# Altium PCB Copy of IoT_SYNTHPATCH.PcbDoc (part 2 of 2)
Units mm, origin at the board's own origin, x right, y up, seen from the top; angles counter-clockwise.
Board outline 99 x 108 mm, 4 copper layers (Top Layer, PWR, GND, Bottom Layer), stack 1.587 mm thick; 354 components, 216 nets, 1040 pads, 0 vias.
Unrouted connection lines stored in the file: 706.
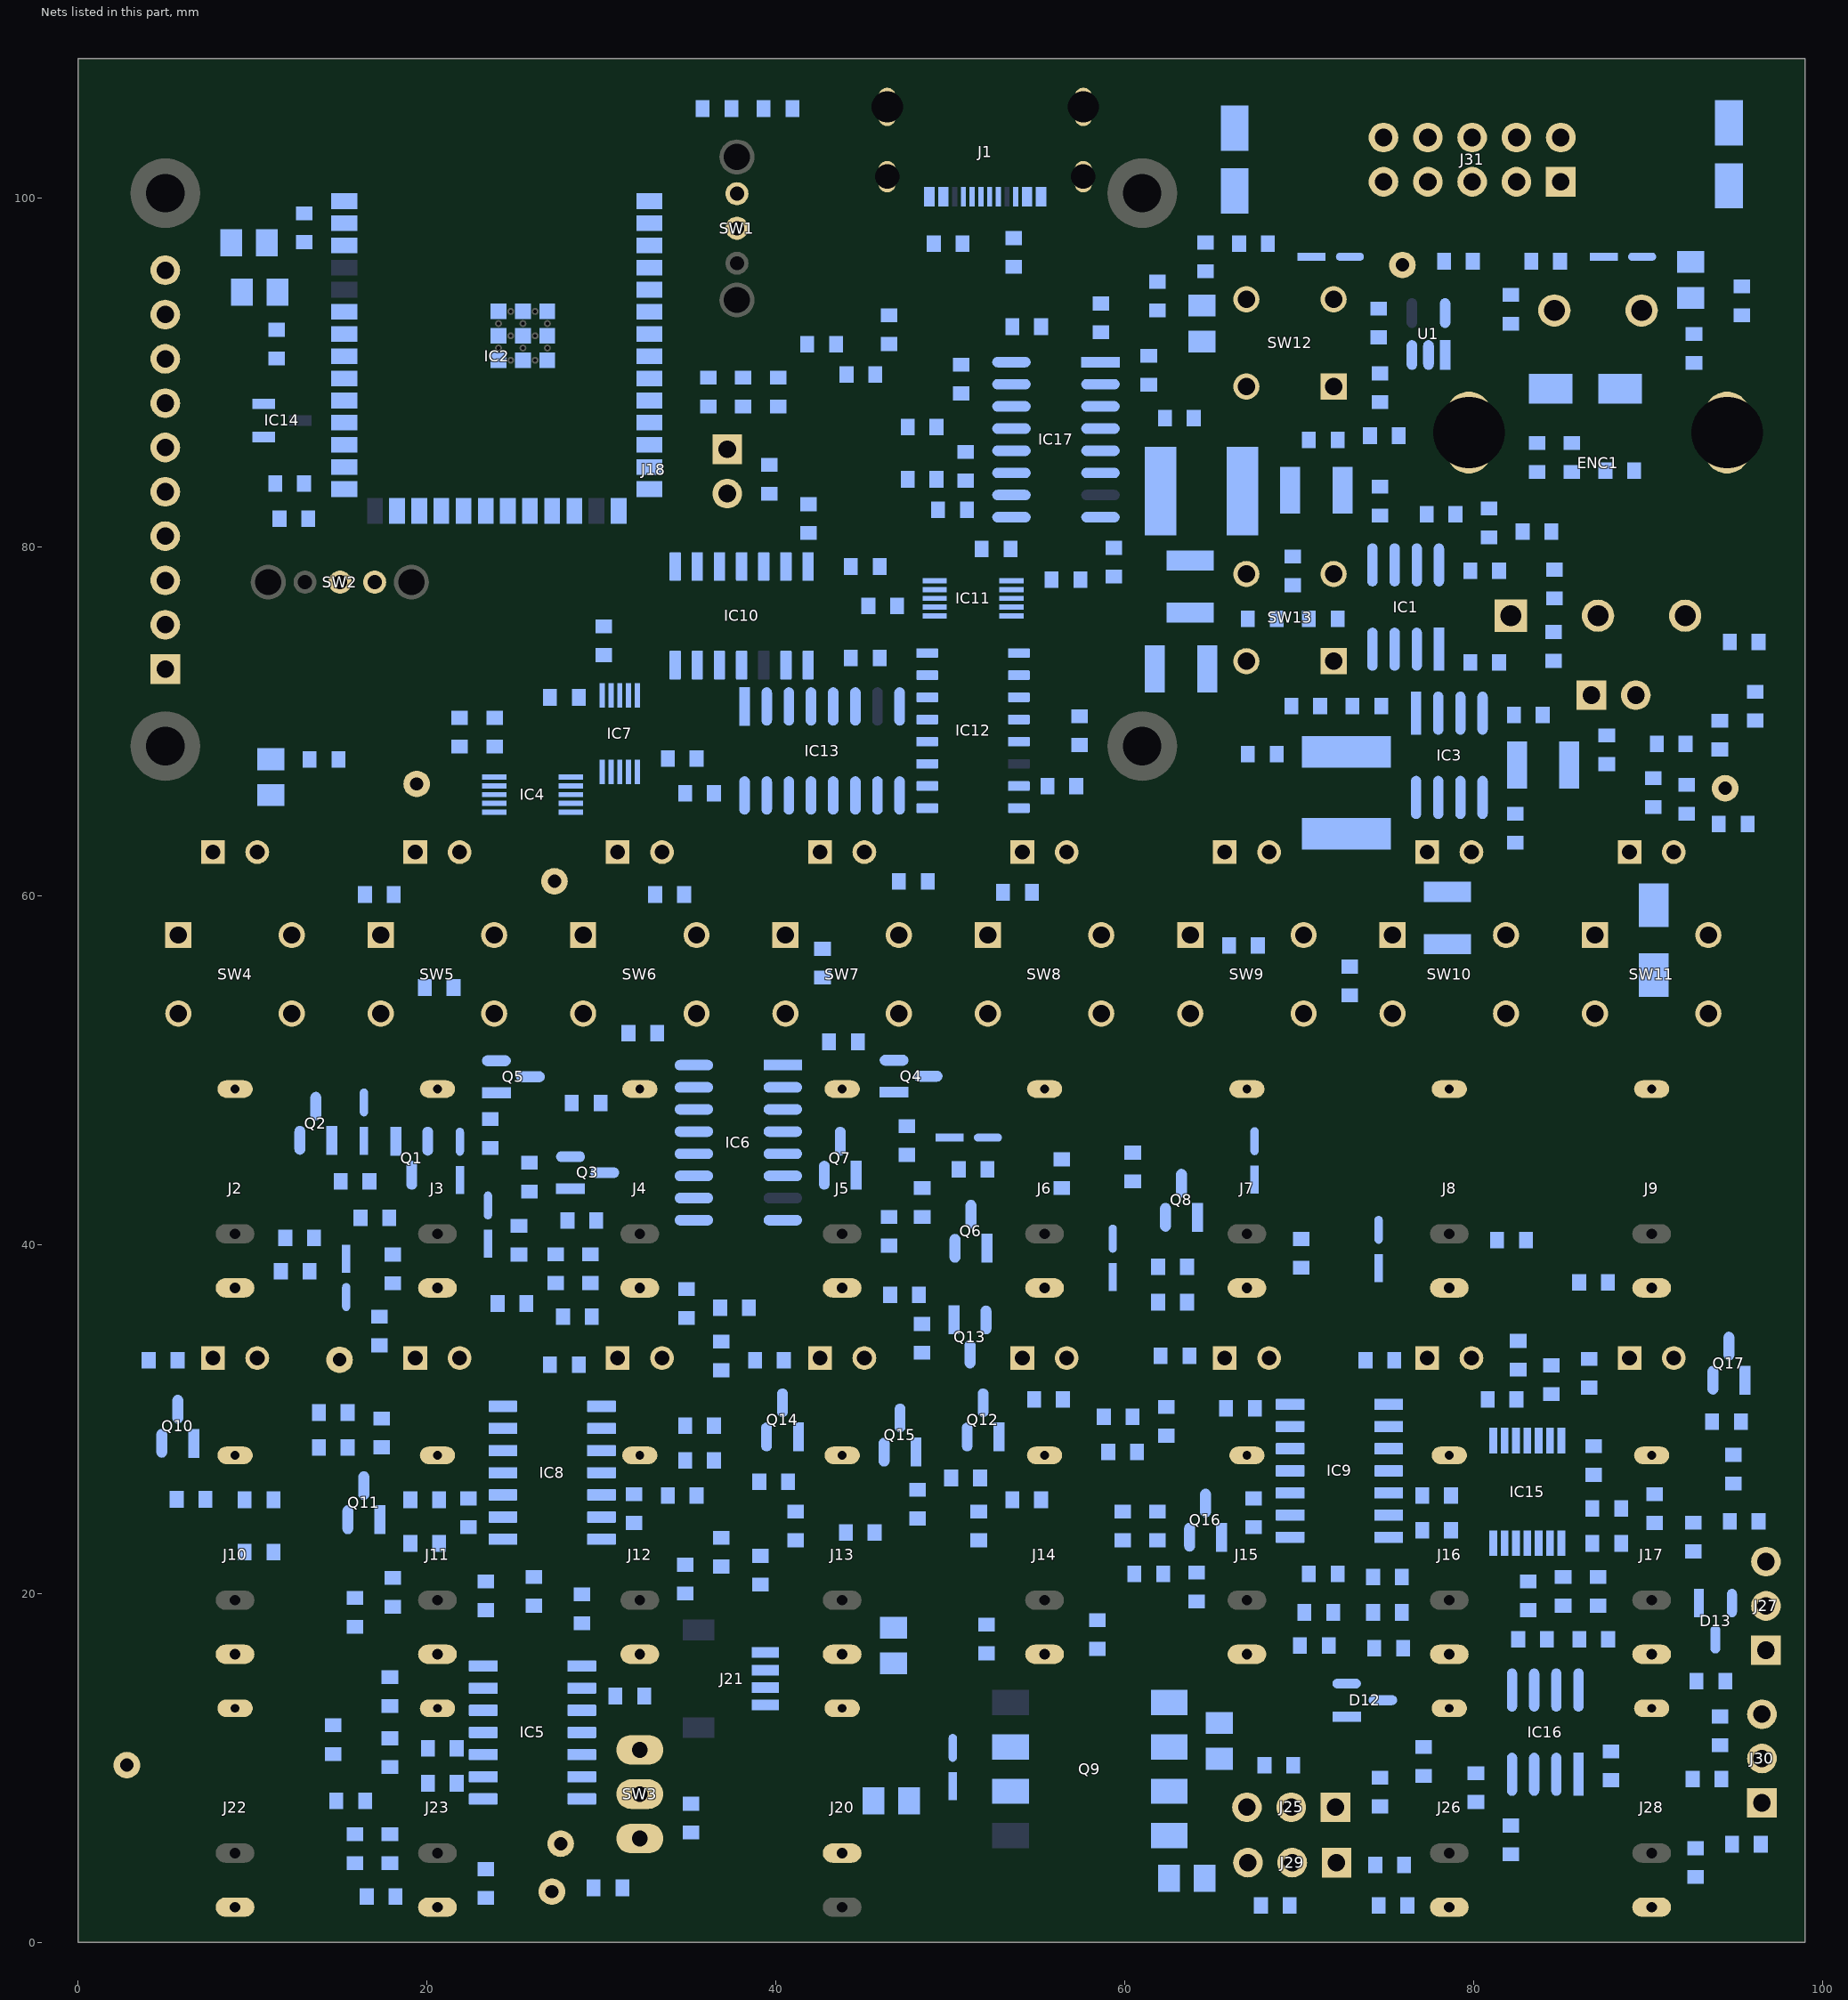
[diagram p4: the nets of this part, all layers, seen from the top]

## Part data
C1 C2 C3 C4 C5 C6 C7 C8 C9 C10 C11 C12 C13 C14 C15 C16 C17 C18 C19 C20 C21 C22 C23 C24 C25 C26 C27 C28 C29 C30 C31 C32 C33 C34 C35 C36 C37 C38 C39 C41 C42 C43 C44 C45 C46 C47 C48 C49 C50 C51 C52 C53 C54 C55 C56 C57 C58 C59 C60 C61 C62 C63 C64 C65 C66 C67 C68 C69 C70 C71 C72 C73 C74 C75 C76 C77 C78 C79 C80 C81 C82 C84 C86 C87 C88 C89: library part CAP, Manufacturer=Vitramon, Part Number=VJ0805Y682KXAMT
C40: library part CAP-np, Manufacturer=Vitramon, Part Number=VJ0805Y682KXAMT
C83 C85: library part Cap_polarized, "WCAP-ASLI Aluminum Electrolytic Capacitors", Capacitance=10µF, Case/Package=Radial, ESR (Equivalent Series Resistance)=1.66693Ω, Insulation Resistance=5.33333MΩ, Leakage Current=3µA, Max Operating Temperature=105°C, Min Operating Temperature=-55°C, Ripple Current=80mA, Tolerance=20%, Voltage Rating=16V, Diameter=4mm, Height=5.5mm, Height - Seated (Max)=5.5118mm, Impedance=2.2Ω, Lead Free="Lead Free", Length=5.5mm, Life (Hours)=2000hours, Mount="Surface Mount", Polarity=Polar, REACH SVHC=Unknown, Ripple Current (AC)=80mA, RoHS=Compliant, Voltage Rating (DC)=16V, Width=4.3mm
D1 D2: library part SCHOTTKY, "DIODE SCHOTTKY 40V 3A SMA", Average Rectified Current=3A, Capacitance=250pF, Case/Package=SMA, Forward Voltage=500mV, Max Forward Surge Current (Ifsm)=80A, Max Operating Temperature=125°C, Max Repetitive Reverse Voltage (Vrrm)=40V, Max Reverse Current=500uA, Min Operating Temperature=-55°C, Package Quantity=5000, Contact Plating=Tin, Current=3A, Current Rating=3A, Element Configuration=Single, Forward Current=3A, Height=2.3mm, Lead Free="Lead Free", Length=4.6mm, Max Reverse Voltage (DC)=40V, Mount="Surface Mount", Number of Pins=2, Output Current=3A, Packaging="Tape and Reel", Peak Non-Repetitive Surge Current=80A, Polarity=Standard, Radiation Hardening=No, REACH SVHC="No SVHC", RoHS Compliant=Yes, Series=-, Termination=SMD/SMT, Voltage=40V, Voltage Rating (DC)=40V, Weight=0.002258oz, Width=2.92mm
D3 D4 D5 D6 D7 D8 D9 D10 D11 D14 D15: library part 4148WS, "DIODE GEN PURP 75V 150MA SOD323F", Average Rectified Current=150mA, Forward Voltage=1V, Max Forward Surge Current (Ifsm)=2A, Max Operating Temperature=150°C, Max Repetitive Reverse Voltage (Vrrm)=75V, Min Operating Temperature=-55°C, Package Quantity=1, Peak Reverse Current=5uA, Power Dissipation=200mW, Contact Plating=Tin, Element Configuration=Single, Forward Current=150mA, Height=1mm, Lead Free="Lead Free", Length=1.8mm, Max Reverse Voltage (DC)=75V, Mount="Surface Mount", Number of Pins=2, Packaging="Tape and Reel", Radiation Hardening=No, REACH SVHC="No SVHC", Recovery Time=4ns, Reverse Recovery Time=4ns, Reverse Voltage=75V, Weight=0.0276g, Width=1.35mm
D12 D13: library part BAT54S, "DIODE ARRAY SCHOTTKY 30V SOT23", Capacitance=10pF, Forward Current=200mA, Manufacturer=Vishay, Max Junction Temp=+125°C, Max Repetitive Reverse Voltage=30V, Max Surge Forward Current=600mA, Package=6.541-5014.01-4, Peak Reverse Current=2uA, Temperature="-55°C to +125°C", Temperature Range Low=-55°C, Automotive=No, Category=Diode, ComponentLink2Description=Datasheet, ComponentLink2URL=http://www.vishay.com/docs/85508/bat54.pdf, Device Class L1="Discrete Semiconductors", Device Class L2=Diodes, Device Class L3="Schottky Diodes", Digikey Description="DIODE ARRAY SCHOTTKY 30V SOT23", Height=1.15mm, Lead Free=Yes, Manufacturer Part Number=BAT54S-E3-08, Mouser Description="Schottky Diodes & Rectifiers 200mA 30 Volt", Octopart=https://octopart.com/bat54s-e3-08-vishay-29186616, RoHS=TRUE, Temperature Range High=+125°C
DS1 DS2 DS3: library part CMP-1674-00012-1, "Through Hole Lamp, 2.1 V, -55 to 100 degC, 2-Pin THD, RoHS, Bulk", Case Code (Imperial)=0603, Case Code (Metric)=1608, Colour=White, Forward Current="20 mA", Forward Voltage="3.6 V", Max Operating Temperature="85 degC", Min Operating Temperature="-40 degC", Package Quantity=4000, Power Rating="78 mW", Case\Package=0603, ComponentLink1Description="Manufacturer URL", ComponentLink1URL=http://www.us.liteon.com/, ComponentLink2Description=Datasheet, ComponentLink2URL=https://datasheet.ciiva.com/4269/s-110-ltl-1chye-4269126.pdf, DatasheetVersion="Rev. B, 07/2013", Height="0.6 mm", Illumination Colour=White, Length="1.6 mm", Lens Style=Diffused, Luminous Intensity="200 mcd", Mount="Surface Mount", Nominal Vf="3.6 V", PackageDescription="2-Pin Through Hole Device, Dia 3.8 mm, Pitch 2.54 mm", PackageReference=LTL-1CHYE, Packaging="Tape and Reel", Pins=2, Radiation Hardening=No, REACH SVHC="No SVHC", RoHSCompliant=true, Viewing Angle="140 degrees", Width="0.8 mm"
DS4 DS5 DS6 DS7 DS8 DS9 DS10 DS11 DS12 DS13 DS14 DS15 DS16 DS17 DS18 DS19: library part LED-Y, "Through Hole Lamp, 2.1 V, -55 to 100 degC, 2-Pin THD, RoHS, Bulk", Case Code (Imperial)=0603, Case Code (Metric)=1608, Colour=White, Forward Current="20 mA", Forward Voltage="3.6 V", Max Operating Temperature="85 degC", Min Operating Temperature="-40 degC", Package Quantity=4000, Power Rating="78 mW", Case\Package=0603, ComponentLink1Description="Manufacturer URL", ComponentLink1URL=http://www.us.liteon.com/, ComponentLink2Description=Datasheet, ComponentLink2URL=https://datasheet.ciiva.com/4269/s-110-ltl-1chye-4269126.pdf, DatasheetVersion="Rev. B, 07/2013", Height="0.6 mm", Illumination Colour=White, Length="1.6 mm", Lens Style=Diffused, Luminous Intensity="200 mcd", Mount="Surface Mount", Nominal Vf="3.6 V", PackageDescription="2-Pin Through Hole Device, Dia 3.8 mm, Pitch 2.54 mm", PackageReference=LTL-1CHYE, Packaging="Tape and Reel", Pins=2, Radiation Hardening=No, REACH SVHC="No SVHC", RoHSCompliant=true, Viewing Angle="140 degrees", Width="0.8 mm"
ENC1: library part ROTARY, "ROTARY ENCODER MECHANICAL 12PPR", Max Operating Temperature=70°C, Min Operating Temperature=-30°C, Operating Supply Voltage=5V, Package Quantity=50, Built in Switch=Yes, Detent=Yes, Encoder Type=Mechanical, Height=17.3mm, Length=23mm, Mount="Through Hole", Number of Channels=2, Orientation=Vertical, Output Type=Quadrature, Pulses per Revolution=12, RoHS Compliant=Yes, Series=PEC16, Termination="PC Pin", Width=16mm
FB1 FB2: library part Ferrite, "Chip Ferrite Bead, 0805, 60Ω @ 100MHz, 0.02Ω, 25%, 1.9A", RoHS Compliant=No
IC1 IC3: library part TPSS54331, "Buck Step Down Regulator with 3.5 to 28 V Input and 0.8 to 25 V Output, -40 to 150 degC, 8-Pin SOIC (D), Green (RoHS & no Sb/Br)", Manufacturer="Texas Instruments", Rating=Catalog, Switch Current Limit(Typ)(A)=3.5, Code_JEDEC=MS-012AA, ComponentLink1Description=Datasheet, ComponentLink1URL=http://www.ti.com/general/docs/lit/getliterature.tsp?genericPartNumber=TPS54331&fileType=pdf, ComponentLink2Description="Package Specification", ComponentLink2URL=http://www.ti.com/litv/pdf/msoi002j, ComponentLink3Description="URL Link1", ComponentLink3URL="Samples URL:http://www.ti.com/product/tps54331#samples", DatasheetVersion=SLVS839D, Duty Cycle(Max)(%)=90, Eco-Plan="Green (RoHS & no Sb/Br)", Iout(Max)(A)=3, Iq(Typ)(mA)=0.11, Mounting Technology="Surface Mount", PackageDescription="8-Pin Plastic Small Outline Integrated Circuit, 4.9 x 3.9 mm, Pitch 1.27 mm Pitch", PackageReference=D8, PackageVersion="revM, Jun-2011", PartNumber=TPS54331DG4, Regulated Outputs(#)=1, SubFamily="Step-Down Regulator", Topology=Buck, Vin(Max)(V)=28, Vin(Min)(V)=3.5, Vout(Max)(V)=25, Vout(Min)(V)=0.8
IC2: "Bluetooth, WiFi 802.11b/g/n, Bluetooth v5.0 Transceiver Module 2.4GHz PCB Trace Surface Mount", Package="NON STANDARD Espressif Systems", Check_prices=https://www.snapeda.com/parts/ESP32S3WROOM1N16R2/Espressif+Systems/view-part/?ref=eda, MF="Espressif Systems", MP=ESP32S3WROOM1N16R2, SnapEDA_Link=https://www.snapeda.com/parts/ESP32S3WROOM1N16R2/Espressif+Systems/view-part/?ref=snap
IC4: "16-bit, dual-channel, low-power, ultra-low glitch, voltage output DAC with 2.5V, 4ppm/C reference", Manufacturer_Name="Texas Instruments", Mouser Part Number=595-DAC8562SDGSR, Datasheet Link=http://www.ti.com/lit/gpn/dac8562, Geometry.Height=1.1mm, Manufacturer_Part_Number=DAC8562SDGSR, Mouser Price/Stock=https://www.mouser.co.uk/ProductDetail/Texas-Instruments/DAC8562SDGSR?qs=L4ss%2FyqpMWQjhHzbOFnTNg%3D%3D
IC5 IC8 IC9: library part tl074, "Quad Low-Noise JFET-Input General-Purpose Operational Amplifier, 7 to 36 V, 0 to 70 degC, 14-pin SOIC (D14), Green (RoHS & no Sb/Br)", Manufacturer="Texas Instruments", Rating=Military, Total Supply Voltage(Max)(+5V is 5, +/-5V is 10)=36, Total Supply Voltage(Min)(+5V is 5, +/-5V is 10)=7, CMRR(Min)(dB)=70, Code_JEDEC=MS-012, ComponentLink1Description="Manufacturer URL", ComponentLink1URL=http://www.ti.com/, ComponentLink2Description=Datasheet, ComponentLink2URL=http://www.ti.com/lit/ds/symlink/tl074.pdf, ComponentLink3Description="Package Specification", ComponentLink3URL=http://www.ti.com/lit/ml/mpds177g/mpds177g.pdf, DatasheetVersion=SLOS080J, Eco-Plan="Green (RoHS & no Sb/Br)", GBW(Typ)(MHz)=3, IIB(Max)(pA)=200, Iq per channel(Max)(mA)=2.5, Mounting Technology="Surface Mount", Number of Channels=4, Offset Drift(Typ)(uV/C)=18, PackageDescription="14-Pin Plastic Small Outline, Body 8.65 x 3.90 mm, Pitch 1.27 mm", PackageReference=D0014A, PackageVersion="4040047-5/M, 06/2011", PartNumber=TL074CDRG4, Slew Rate(Typ)(V/us)=13, Sub Family="General Purpose Amplifier, High Supply Voltage Amplifier (>=30V)", Vio (25C)(Max)(mV)=10, Vn at 1kHz(Typ)(nV/rtHz)=18
IC6 IC13 IC17: library part 74HC165, "IC SHIFT REGST 8BIT PI-SO 16SOIC", Ambient Temperature Range High=+125°C, Ambient Temperature Range Low=-40°C, Frequency=61MHz, Manufacturer=Nexperia, Max Supply Voltage=6V, Min Supply Voltage=2V, Nominal Supply Current=8uA, Package=SOT109-1, Temperature="-40°C to +125°C", Automotive=No, Category=IC, ComponentLink2Description=Datasheet, ComponentLink2URL=https://assets.nexperia.com/documents/data-sheet/74HC_HCT165.pdf, Device Class L1="Integrated Circuits (ICs)", Device Class L2="Logic ICs", Device Class L3="Shift Registers", Digikey Description="IC SHIFT REGST 8BIT PI-SO 16SOIC", Footprint Url=https://assets.nexperia.com/documents/outline-drawing/SOT109-1.pdf, Height=1.75mm, Ipc Land Pattern Name=SOP127P600X175-16, Lead Free=Yes, Logic Function Desc="Shift Register", Manufacturer Part Number=74HC165D,653, Number Of Circuits=1, Number Of Inputs=8, Number Of Outputs=1, Octopart=https://octopart.com/74hc165d%2C653-nexperia-78737091, Propagation Delay=15ns, RoHS=TRUE, Standoff Height=0.1mm, Temperature Range High=+125°C, Temperature Range Low=-40°C
IC7 IC11: "12-Bit Micro Power QUAD Digital-to-Analog Converter with Rail-to-Rail Output", Manufacturer_Name="Texas Instruments", Manufacturer_Part_Number=DAC124S085CIMM/NOPB, Mouser Part Number=926-DAC124S085CIMMNO, Datasheet Link=http://www.ti.com/lit/gpn/dac124s085, Geometry.Height=1.1mm, Mouser Price/Stock=https://www.mouser.co.uk/ProductDetail/Texas-Instruments/DAC124S085CIMM-NOPB?qs=7X5t%252BdzoRHBv34DgWfHrUA%3D%3D
IC10: library part 74HCT125, "IC BUF NON-INVERT 5.5V 14SOIC", Case/Package=SOIC, High Level Output Current=-6mA, Low Level Output Current=6mA, Max Operating Temperature=85°C, Max Supply Voltage=5.5V, Min Operating Temperature=-40°C, Min Supply Voltage=4.5V, Operating Supply Voltage=5V, Package Quantity=2500, Quiescent Current=8uA, Contact Plating=Gold, Height=1.58mm, Lead Free="Lead Free", Length=8.65mm, Logic Function=Buffer, Mount="Surface Mount", Number of Bits=4, Number of Bits per Element=1, Number of Channels=4, Number Of Circuits=4, Number of Elements=4, Number of Input Lines=4, Number Of Inputs=4, Number of Output Lines=4, Number Of Outputs=4, Number of Pins=14, Packaging="Tape and Reel", Polarity=Non-Inverting, Propagation Delay=50ns, Radiation Hardening=No, REACH SVHC="No SVHC", RoHS Compliant=Yes, Turn-On Delay Time=36ns, Width=3.91mm
IC12: library part TLC5916, "Automotive Catalog 8-Bit Constant-Current LED Sink Drivers, 3 to 5.5 V, -40 to 125 degC, 16-pin SOIC (D16), Green (RoHS & no Sb/Br)", Manufacturer="Texas Instruments", Code_JEDEC=MS-012, ComponentLink1Description="Manufacturer URL", ComponentLink1URL=http://www.ti.com/, ComponentLink2Description=Datasheet, ComponentLink2URL=http://www.ti.com/general/docs/lit/getliterature.tsp?genericPartNumber=TLC5916-Q1&fileType=pdf, ComponentLink3Description="Package Specification", ComponentLink3URL=http://www.ti.com/litv/pdf/mpds178g, DatasheetVersion=SLVS814, Eco-Plan="Green (RoHS & no Sb/Br)", Iout(Max)(A)=0.12, Mounting Technology="Surface Mount", PackageDescription="16-Pin Plastic Small Outline, Body 9.90 x 3.90 mm, Pitch 1.27 mm", PackageReference=D0016A, PackageVersion=4040047-6/M, PartNumber=TLC5916QDRQ1, SubFamily="LED Driver", Vin(Max)(V)=5.5, Vin(Min)(V)=3
IC14: library part lm4040, "Precision Micropower Shunt Voltage Reference, 3-pin SOT-23, Pb-Free", Manufacturer="National Semiconductor", PackageTopMarking=R5C*XTT, PowerWise=N, ComponentLink1Description="LM4040 Datasheet", ComponentLink1URL=http://www.national.com/ds/LM/LM4040.pdf, ComponentLink2Description="LM4040 Web Page", ComponentLink2URL=http://www.national.com/pf/LM/LM4040.html, ComponentLink3Description="MF03A Package Page", ComponentLink3URL=http://www.national.com/packaging/folders/mf03a.html, CompType="Voltage Reference IC", DatasheetVersion=Apr-2005, PackageDescription="Molded SOT-23, .115 x .051 x .037in Body, 3 Lead, .075 in Pitch", PackageReference=MF03A, PackageVersion="revB, Mar-2003", PinCount=3, RevisionNote="Component URLs added", RoHS=Y
IC15: "99dB SNR Stereo ADC With Single-Ended Inputs", Manufacturer_Name="Texas Instruments", Mouser Part Number=595-PCM1808PW, Datasheet Link=http://www.ti.com/lit/gpn/pcm1808, Geometry.Height=1.2mm, Manufacturer_Part_Number=PCM1808PW, Mouser Price/Stock=https://www.mouser.co.uk/ProductDetail/Texas-Instruments/PCM1808PW?qs=iSMark9AYDWYQaMpH%2FhwPg%3D%3D
IC16: library part tl072, "Low-Noise JFET-Input Operational Amplifier, 7 to 36 V, 0 to 70 degC, 8-pin SOIC (D8), Green (RoHS & no Sb/Br)", Manufacturer="Texas Instruments", Rating=Catalog, Total Supply Voltage(Max)(+5V is 5, +/-5V is 10)=36, Total Supply Voltage(Min)(+5V is 5, +/-5V is 10)=7, CMRR(Min)(dB)=75, Code_JEDEC=MS-012, ComponentLink1Description="Manufacturer URL", ComponentLink1URL=http://www.ti.com/, ComponentLink2Description=Datasheet, ComponentLink2URL=http://www.ti.com/lit/ds/symlink/tl072a.pdf, ComponentLink3Description="Package Specification", ComponentLink3URL=http://www.ti.com/litv/pdf/msoi002j, DatasheetVersion=SLOS080J, Eco-Plan="Green (RoHS & no Sb/Br)", GBW(Typ)(MHz)=3, IIB(Max)(pA)=200, Iq per channel(Max)(mA)=2.5, Mounting Technology="Surface Mount", Number of Channels=2, Offset Drift(Typ)(uV/C)=18, PackageDescription="8-Pin Plastic Small Outline, Body 4.9 x 3.9 mm, Pitch 1.27 mm", PackageReference=D8, PackageVersion="4040047-3/M, 06/2011", PartNumber=TL072ACDRE4, Slew Rate(Typ)(V/us)=13, Sub Family="General Purpose Amplifier, High Supply Voltage Amplifier (>=30V)", Vio (25C)(Max)(mV)=6, Vn at 1kHz(Typ)(nV/rtHz)=18
J1: library part USBC16, "CONN RCP USB2.0 TYP C 24P SMD RA"
J2 J3 J4 J5 J6 J7 J8 J9 J10 J11 J12 J13 J14 J15 J16 J17 J22 J23 J26 J28: "3.5mm Switching Jack Socket", Package=Package, Availability="Not in stock", MF=Thonk, MP=PJ398SM-12, Price=None
J18: library part DFR0664
J20: library part MIDI_connector, "3.5mm TRS jack (stereo Thonkiconn PJ366ST), MIDI TRS Type A: tip=5, ring=4, sleeve=2", Case/Package=Metal, Color=Black, Current Rating=3A, Package Quantity=1, Voltage Rating=34V, Body Material=Metal, Connector Type=Receptacle, Contact Plating=Nickel, Contact Type=Pin, Fastening Type=Pull, Gender=Female, Insulation Material=Plastic, Lead Free="Lead Free", Mount="Through Hole", Number of Contacts=5, Number of Ports=1, Number of Positions=5, Number of Terminals/Pins=5, Orientation="Right Angle", Packaging=Bulk, Radiation Hardening=No, RoHS Compliant=Yes, Series=-, Strain Relief="No (Without)", Termination=Solder
J21: "Description", Manufacturer_Name="Adafruit Industries", Copyright="Copyright (C) 2025 Ultra Librarian. All rights reserved.", Manufacturer_Part_Number=4208, RefDes=RefDes, Type=Type
J31: library part EURORACK_PWR_2x5, "Eurorack power header 2x5 shrouded. Pin 1-2 -12V (red stripe), 3-8 GND, 9-10 +12V"
L1 L2: library part Inductor, "6.8uH shielded power inductor 6x6 mm, Isat >= 2 A (e.g. Bourns SRN6045TA-6R8M)", Ambient Temperature Range High=85°C, Case/Package=0805, DC Resistance (DCR)=50mΩ, Inductance=110nH, Max DC Current=2A, Min Operating Temperature=-40°C, Self Resonant Frequency=1.2GHz, Test Frequency=7.9MHz, Tolerance=2%, Composition=Wirewound, Core Material="Ceramic, Ferrite", Height=1.6mm, Lead Free="Contains Lead", Length=2.29mm, Lifecycle Status=Production, Max Operating Temperature=85°C, NexarPartId=6751235, Q Factor=19, RMS Current (Irms)=2A, RoHS=Compliant, Series Resistance=50mΩ, Termination=SMD/SMT, Weight=5.499807mg, Width=1.91mm
Q1 Q2 Q3 Q4 Q5 Q6 Q7 Q8 Q10 Q11 Q12 Q13 Q14 Q15 Q16 Q17: library part 3904, "TRANS NPN 40V 0.2A SMD SOT23-3", Case/Package=SOT-23, Collector Base Voltage (VCBO)=60V, Collector Emitter Breakdown Voltage=40V, Collector Emitter Saturation Voltage=300mV, Continuous Collector Current=200mA, Emitter Base Voltage (VEBO)=6V, Frequency=300MHz, Max Operating Temperature=150°C, Max Power Dissipation=300mW, Min Operating Temperature=-55°C, Package Quantity=3000, Power Dissipation=350mW, Collector Emitter Voltage (VCEO)=40V, Contact Plating=Tin, Element Configuration=Single, Gain Bandwidth Product=300MHz, Height=1mm, hFE Min=100, Lead Free="Lead Free", Length=3.05mm, Max Breakdown Voltage=40V, Max Collector Current=200mA, Max Frequency=300MHz, Mount="Surface Mount", Number of Elements=1, Number of Pins=3, Packaging="Tape and Reel", Polarity=NPN, Radiation Hardening=No, REACH SVHC="No SVHC", Transition Frequency=300MHz, Voltage Rating (DC)=40V, Weight=0.000282oz, Width=1.4mm
Q9: "OPTOISO 3.75KV OPN COLL 8DIP GW", Ambient Temperature Range High=+85°C, Ambient Temperature Range Low=-40°C, Forward Current=10mA, Forward Voltage=1.5V, Isolation Voltage=3750Vrms, Manufacturer=Broadcom, Manufacturer Part Number=6N137-300E, Max Supply Voltage=5.5V, Min Supply Voltage=4.5V, Package=0, Reverse Voltage=5V, Temperature="-40°C to +85°C", Automotive=No, Category=Trans, ComponentLink2Description=Datasheet, ComponentLink2URL=https://docs.broadcom.com/docs/AV02-0940EN, Device Class L1=Optoelectronics, Device Class L2=Optocouplers, Device Class L3=unset, Digikey Description="OPTOISO 3.75KV OPN COLL 8DIP GW", Height=4.455mm, Lead Free=Yes, Mouser Description="High Speed Optocouplers 10 Mb/s 3750Vrms", Octopart=https://octopart.com/6n137-300e-broadcom-71125550, RoHS=TRUE, Standoff Height=0.505mm, Temperature Range High=+85°C, Temperature Range Low=-40°C, Turn Off Delay Time=50ns, Turn On Delay Time=48ns
R1 R2 R3 R4 R5 R6 R7 R8 R9 R10 R11 R12 R13 R14 R15 R16 R17 R18 R19 R20 R21 R22 R23 R24 R25 R26 R27 R28 R29 R30 R31 R32 R33 R34 R35 R36 R37 R38 R39 R40 R41 R42 R43 R44 R45 R46 R47 R48 R49 R50 R51 R52 R53 R54 R55 R56 R57 R58 R59 R60 R61 R62 R63 R64 R65 R66 R67 R68 R69 R70 R71 R72 R73 R74 R75 R76 R77 R78 R79 R80 R81 R82 R83 R84 R85 R86 R87 R88 R89 R90 R91 R92 R93 R94 R95 R96 R97 R98 R99 R100 R101 R102 R103 R104 R105 R106 R107 R108 R109 R110 R111 R112 R113 R114 R115 R116 R117 R118 R119 R120 R121 R122 R123 R124 R125 R126 R127 R128 R129 R130 R131 R132 R133 R134 R135 R136 R137 R138 R139: library part Resistor, "RES 10K OHM 0.1% 1/8W 0805"
SW1 SW2: "Switch Slide ON ON SPDT Side Slide 0.1A 12VDC 10000Cycles PC Pins Bracket Mount/Through Hole Bulk", Package=None, Check_prices=https://www.snapeda.com/parts/OS102011MA1QN1/Littelfuse/view-part/?ref=eda, MF=Littelfuse/C&K, MP=OS102011MA1QN1, SnapEDA_Link=https://www.snapeda.com/parts/OS102011MA1QN1/Littelfuse/view-part/?ref=snap
SW3: library part SPDT, "7101SD9CQE Toggle Switch, Spdt, On-On, Maintained, 5A, 28Vdc, 3 Pcb Hole Cnt, Solder Terminal, Toggle", Contact Current Rating=5A, Contact Resistance=10mΩ, Max Operating Temperature=85°C, Max Voltage Rating (AC)=250V, Max Voltage Rating (DC)=28V, Min Operating Temperature=-30°C, Voltage Rating (AC)=120V, Actuator Length=12.45mm, Actuator Material="Brass, Chrome", Contact Material=Silver, Contact Plating=Silver, Current Rating=5A, Depth=6.86mm, Electrical Life=100kcycles, Housing Material="Stainless Steel", Illumination Type="Illuminated, Non-Illuminated", Lead Free="Lead Free", Length=12.7mm, Life (Cycles)=100kcycles, Max Current Rating=5A, Mount="Through Hole", NexarPartId=55410166, Orientation=Straight, Radiation Hardening=No, RoHS=Compliant, Switch Function=On-On, Termination="PC Pins", Throw Configuration=SPDT, Voltage Rating (DC)=28V
SW4 SW5 SW6 SW7 SW8 SW9 SW10 SW11 SW12 SW13: "FSM4JH=6MM TACT SWITCH, HIGH TEMP", Package=None, Check_prices=https://www.snapeda.com/parts/1825910-6/TE+Connectivity+Alcoswitch+Switches/view-part/?ref=eda, MF="TE Connectivity", MP=1825910-6, SnapEDA_Link=https://www.snapeda.com/parts/1825910-6/TE+Connectivity+Alcoswitch+Switches/view-part/?ref=snap
tp1 tp2 tp3 tp4 tp5 tp6 tp7 tp8: library part Testpoint
U1: library part CMP-12756-000035-1, "IC REG LINEAR 3.3V 600MA SOT25", Case/Package=SOT-23-5, Dropout Voltage=250mV, Max Input Voltage=6V, Max Operating Temperature=85°C, Max Output Current=600mA, Min Input Voltage=2.5V, Min Operating Temperature=-40°C, Output Voltage=3.3V, Package Quantity=1, Quiescent Current=55uA, Accuracy=1.5%, Height=1.3mm, Lead Free="Lead Free", Length=3.1mm, Mount="Surface Mount", Number Of Outputs=1, Number of Pins=5, Number of Regulators=1, Output Current=600mA, Output Type=Fixed, Packaging="Tape and Reel", Polarity=Positive, Width=1.7mm

## Nets (pads, with @x,y where several pads share a name; then routed paths per layer and width w, separated by ;. In a path a pad name is that pad's centre, name@x,y a point inside that pad or via, vN(x,y) a via of type N, cw(c..) or ccw(c..) an arc to the next point about the centre after c; other vN are vias at no path point)
+3.3: C10.2 C11.2 C17.2 C34.1 C40.2 C60.1 C61.2 C73.2 C87.1 IC2.2 IC6.16 IC12.16 IC13.16 IC15.4 IC17.16 J19.2 J21.2 L1.2 Q9.8 R1.2 R4.1 R7.2 R11.1 R32.1 R33.1 R34.1 R35.1 R36.1 R37.1 R38.1 R40.1 R76.2 R81.1 R82.1 R83.1 R84.1 R85.1 R86.1 R87.1 R88.1 R89.2 R117.2 R118.2 R121.2 R132.1 R133.1 R134.1 R135.1 R136.1 R137.1 R138.1 R139.1
+5: C22.2 C23.2 C24.2 C28.2 C29.2 C37.2 C38.2 C41.2 C42.2 C62.2 C63.2 C88.2 C89.2 DS4.1 DS5.1 DS6.1 DS7.1 DS8.1 DS9.1 DS10.1 DS11.1 IC4.9 IC7.1 IC10.14 IC11.1 J18.1 L2.2 R10.1 R16.1 R19.2 R92.1 R93.1 R98.1 R99.1 R104.1 R105.1 R110.1 R111.1 R123.2
+5_USB: C2.2 C3.2 J1.A4-B9 J1.B4-A9 U1.1 U1.3
+12: C19.2 C20.2 C21.2 C30.2 C44.1 C45.1 C48.1 C49.1 C58.2 C74.1 C75.1 D12.2 D13.2 FB2.1 IC3.2 IC5.4 IC8.4 IC9.4 IC16.8 J24.1 R14.2 R116.1
-12: C31.2 C46.1 C47.1 C50.1 C51.1 C59.2 C76.1 C77.1 D12.1 D13.1 FB1.1 IC5.11 IC8.11 IC9.11 IC16.4
ADC_INL: C72.1 D12.3 R127.2
ADC_INR: C69.1 D13.3 R131.2
BOOT: C15.2 IC2.27 R76.1 SW2.2
D0: IC6.11 Q1.3 R32.2
D0_L: IC13.11 R81.2 SW4.3 SW4.4
D0_M: IC17.11 R132.2 SW12.3 SW12.4
D1: IC6.12 Q3.3 R33.2
D1_L: IC13.12 R82.2 SW5.3 SW5.4
D1_M: IC17.12 R133.2 SW13.3 SW13.4
D2: IC6.13 Q5.3 R34.2
D2_L: IC13.13 R83.2 SW6.3 SW6.4
D2_M: IC17.13 R134.2
D3: IC6.14 Q7.3 R35.2
D3_L: IC13.14 R84.2 SW7.3 SW7.4
D3_M: IC17.14 R135.2
D4: IC6.3 Q2.3 R36.2
D4_L: IC13.3 R85.2 SW8.3 SW8.4
D4_M: IC17.3 R136.2
D5: IC6.4 Q4.3 R37.2
D5_L: IC13.4 R86.2 SW9.3 SW9.4
D5_M: IC17.4 R137.2
D6: IC6.5 Q6.3 R38.2
D6_L: IC13.5 R87.2 SW10.3 SW10.4
D6_M: IC17.5 R138.2
D7: IC6.6 Q8.3 R40.2
D7_L: IC13.6 R88.2 SW11.3 SW11.4
D7_M: IC17.6 R139.2
D_N: IC2.13 R78.1
D_P: IC2.14 R77.1
ENC_A: ENC1.A R117.1 R119.2
ENC_B: ENC1.B R121.1 R122.2
ENC_SW: ENC1.E R118.1 R120.2
GND: C2.1 C3.1 C4.1 C4.2 C5.1 C5.2 C6.1 C6.2 C7.1 C8.1 C9.1 C10.1 C11.1 C13.1 C14.2 C15.1 C16.1 C17.1 C19.1 C20.1 C21.1 C22.1 C23.1 C24.1 C26.1 C27.1 C27.2 C28.1 C29.1 C30.1 C31.1 C34.2 C37.1 C38.1 C39.1 C40.1 C41.1 C42.1 C43.1 C44.2 C45.2 C46.2 C47.2 C48.2 C49.2 C50.2 C51.2 C58.1 C59.1 C60.2 C61.1 C62.1 C63.1 C64.1 C65.1 C66.1 C67.1 C68.1 C70.1 C71.1 C73.1 C74.2 C75.2 C76.2 C77.2 C82.2 C83.1 C84.1 C85.2 C86.2 C87.2 C88.1 C89.1 D1.2 D2.2 D3.2 D4.2 D5.2 D6.2 D7.2 D8.2 D9.2 D10.2 D14.1 D15.2 DS1.2 DS2.2 DS3.2 ENC1.1 ENC1.2 ENC1.C ENC1.D IC1.7 IC2.GND IC3.4 IC3.7 IC4.3 IC4.4 IC5.12 IC6.8 IC6.15 IC7.6 IC10.1 IC10.2 IC10.4 IC10.7 IC10.10 IC10.13 IC11.6 IC12.1 IC13.8 IC13.15 IC14.2 IC15.2 IC15.5 IC15.10 IC15.11 IC15.12 IC16.3 IC16.5 IC17.8 IC17.10 IC17.15 J1.1 J1.2 J1.3 J1.4 J1.A1-B12 J1.B1-A12 J2.3 J3.3 J4.3 J5.3 J6.3 J7.3 J8.3 J9.3 J10.3 J11.3 J12.3 J13.3 J14.3 J15.3 J16.3 J17.3 J18.2 J19.1 J21.1 J22.3 J23.3 J26.3 J28.3 J31.3 J31.4 J31.5 J31.6 J31.7 J31.8 Q1.2 Q2.2 Q3.2 Q4.2 Q5.2 Q6.2 Q7.2 Q8.2 Q9.5 Q10.2 Q11.2 Q12.2 Q13.2 Q14.2 Q15.2 Q16.2 Q17.2 R5.1 R6.1 R8.1 R9.1 R13.1 R17.1 R18.1 R20.1 R30.1 R31.1 R42.1 R43.1 R46.1 R47.1 R50.1 R51.1 R54.1 R56.1 R66.1 R68.1 R79.1 R80.1 R91.1 R94.2 R95.2 R100.2 R101.2 R106.2 R107.2 R112.2 R113.2 SW1.3 SW2.3 SW3.3 SW4.1 SW4.2 SW5.1 SW5.2 SW6.1 SW6.2 SW7.1 SW7.2 SW8.1 SW8.2 SW9.1 SW9.2 SW10.1 SW10.2 SW11.1 SW11.2 SW12.1 SW12.2 SW13.1 SW13.2 U1.2 U1.5
NetC1_1: C1.1 IC1.1
NetC1_2: C1.2 D1.1 IC1.8 L1.1
NetC7_2: C7.2 C8.2 C9.2 IC1.2 J24.2 R2.2
NetC12_1: C12.1 R13.2
NetC12_2: C12.2 C13.2 IC1.6
NetC14_1: C14.1 IC2.3 R7.1 SW1.2
NetC16_2: C16.2 IC1.4
NetC18_1: C18.1 IC3.1
NetC18_2: C18.2 D2.1 IC3.8 L2.1
NetC25_1: C25.1 R79.2
NetC25_2: C25.2 C26.2 IC3.6
NetC32_1: C32.1 IC5.8 R26.2
NetC32_2: C32.2 IC5.9 R22.2 R23.2
NetC33_1: C33.1 IC5.7 R27.2
NetC33_2: C33.2 IC5.6 R21.2 R25.1
NetC35_1: C35.1 IC8.1 R52.2 R55.1 R96.2
NetC35_2: C35.2 IC8.2 R52.1 R54.2
NetC36_1: C36.1 IC9.1 R53.2 R57.1 R108.2
NetC36_2: C36.2 IC9.2 R53.1 R56.2
NetC52_1: C52.1 IC8.7 R58.2 R61.1 R97.2
NetC52_2: C52.2 IC8.6 R58.1 R60.2
NetC53_1: C53.1 IC9.7 R59.2 R63.1 R109.2
NetC53_2: C53.2 IC9.6 R59.1 R62.2
NetC54_1: C54.1 IC8.8 R64.2 R67.1 R102.2
NetC54_2: C54.2 IC8.9 R64.1 R66.2
NetC55_1: C55.1 IC9.8 R65.2 R69.1 R114.2
NetC55_2: C55.2 IC9.9 R65.1 R68.2
NetC56_1: C56.1 IC8.14 R70.2 R73.1 R103.2
NetC56_2: C56.2 IC8.13 R70.1 R72.2
NetC57_1: C57.1 IC9.14 R71.2 R75.1 R115.2
NetC57_2: C57.2 IC9.13 R71.1 R74.2
NetC64_2: C64.2 IC2.32 R119.1
NetC65_2: C65.2 IC2.34 R120.1
NetC66_2: C66.2 IC2.33 R122.1
NetC69_2: C69.2 IC15.14
NetC70_2: C70.2 C71.2 IC15.3 R123.1
NetC72_2: C72.2 IC15.13
NetC78_1: C78.1 C80.1 IC16.2 R124.1 R125.1 R126.2
NetC78_2: C78.2 J29.3
NetC79_1: C79.1 C81.1 IC16.6 R128.1 R129.1 R130.2
NetC79_2: C79.2 J30.3
NetC80_2: C80.2 J29.1
NetC81_2: C81.2 J30.1
NetC83_2: C83.2 C84.2 D14.2 FB1.2 J31.1 J31.2
NetC85_1: C85.1 C86.1 D15.1 FB2.2 J31.9 J31.10
NetD3_1: D3.1 Q1.1 R28.2 R30.2
NetD4_1: D4.1 Q2.1 R29.2 R31.2
NetD5_1: D5.1 Q3.1 R39.2 R42.2
NetD6_1: D6.1 Q4.1 R41.2 R43.2
NetD7_1: D7.1 Q5.1 R44.2 R46.2
NetD8_1: D8.1 Q6.1 R45.2 R47.2
NetD9_1: D9.1 Q7.1 R48.2 R50.2
NetD10_1: D10.1 Q8.1 R49.2 R51.2
NetD11_1: D11.1 Q9.2 R90.2
NetD11_2: D11.2 J20.5 Q9.3
NetDS1_1: DS1.1 R10.2
NetDS2_1: DS2.1 R11.2
NetDS3_1: DS3.1 R12.2
NetDS4_2: DS4.2 IC12.5
NetDS5_2: DS5.2 IC12.6
NetDS6_2: DS6.2 IC12.7
NetDS7_2: DS7.2 IC12.8
NetDS8_2: DS8.2 IC12.9
NetDS9_2: DS9.2 IC12.10
NetDS10_2: DS10.2 IC12.11
NetDS11_2: DS11.2 IC12.12
NetDS12_1: DS12.1 R92.2
NetDS12_2: DS12.2 Q10.3
NetDS13_1: DS13.1 R93.2
NetDS13_2: DS13.2 Q11.3
NetDS14_1: DS14.1 R98.2
NetDS14_2: DS14.2 Q12.3
NetDS15_1: DS15.1 R99.2
NetDS15_2: DS15.2 Q13.3
NetDS16_1: DS16.1 R104.2
NetDS16_2: DS16.2 Q14.3
NetDS17_1: DS17.1 R105.2
NetDS17_2: DS17.2 Q15.3
NetDS18_1: DS18.1 R110.2
NetDS18_2: DS18.2 Q16.3
NetDS19_1: DS19.1 R111.2
NetDS19_2: DS19.2 Q17.3
NetIC1_3: IC1.3 R2.1 R6.2
NetIC1_5: IC1.5 R3.2 R5.2
NetIC2_4: IC2.4 J18.9
NetIC2_5: IC2.5 J18.7
NetIC2_6: IC2.6 J18.8
NetIC2_7: IC2.7 J18.10
NetIC2_8: IC2.8 IC7.9
NetIC2_9: IC2.9 IC12.4
NetIC2_10: IC2.10 IC7.8 IC10.12 IC11.8 IC12.2
NetIC2_11: IC2.11 IC7.10 IC10.9 IC11.10 IC12.3
NetIC2_12: IC2.12 IC10.5
NetIC2_15: IC2.15 IC6.1 IC13.1 IC17.1 R1.1
NetIC2_17: IC2.17 J18.5
NetIC2_18: IC2.18 J18.6
NetIC2_19: IC2.19 J18.4
NetIC2_20: IC2.20 J18.3
NetIC2_21: IC2.21 Q9.6 R89.1
NetIC2_22: IC2.22 J21.4
NetIC2_23: IC2.23 IC11.9
NetIC2_24: IC2.24 IC6.2 IC13.2 IC17.2
NetIC2_25: IC2.25 IC6.9
NetIC2_28: IC2.28 IC15.6
NetIC2_29: IC2.29 IC15.8
NetIC2_30: IC2.30 IC15.7
NetIC2_31: IC2.31 J21.3
NetIC2_35: IC2.35 IC15.9
NetIC2_38: IC2.38 IC12.13
NetIC2_39: IC2.39 R12.1
NetIC3_3: IC3.3 R14.1 R18.2
NetIC3_5: IC3.5 R15.2 R17.2
NetIC4_5: IC4.5 R19.1
NetIC4_6: IC4.6 IC10.6
NetIC4_7: IC4.7 IC10.8
NetIC4_8: IC4.8 IC10.11
NetIC5_2: IC5.2 R20.2 R24.2
NetIC5_13: IC5.13 IC5.14
NetIC6_10: IC6.10 IC13.9
NetIC12_15: IC12.15 R80.2
NetIC13_10: IC13.10 IC17.9
NetIC16_1: IC16.1 J25.2 J29.2 R127.1
NetIC16_7: IC16.7 J27.2 J30.2 R131.1
NetJ1_A5: J1.A5 R8.2
NetJ1_A6: J1.A6 J1.B6 R77.2
NetJ1_A7: J1.A7 J1.B7 R78.2
NetJ1_B5: J1.B5 R9.2
NetJ2_1: J2.1 R28.1
NetJ3_1: J3.1 R29.1
NetJ4_1: J4.1 R39.1
NetJ5_1: J5.1 R41.1
NetJ6_1: J6.1 R44.1
NetJ7_1: J7.1 R45.1
NetJ8_1: J8.1 R48.1
NetJ9_1: J9.1 R49.1
NetJ10_1: J10.1 R55.2
NetJ11_1: J11.1 R57.2
NetJ12_1: J12.1 R61.2
NetJ13_1: J13.1 R63.2
NetJ14_1: J14.1 R67.2
NetJ15_1: J15.1 R69.2
NetJ16_1: J16.1 R73.2
NetJ17_1: J17.1 R75.2
NetJ20_4: J20.4 R90.1
NetJ22_1: J22.1 R22.1 R26.1 tp4.1
NetJ23_1: J23.1 R21.1 R27.1 tp3.1
NetJ25_1: J25.1 R124.2
NetJ25_3: J25.3 R125.2
NetJ26_1: J26.1 R126.1
NetJ27_1: J27.1 R128.2
NetJ27_3: J27.3 R129.2
NetJ28_1: J28.1 R130.1
NetQ9_7: Q9.7 R91.2
NetQ10_1: Q10.1 R94.1 R96.1
NetQ11_1: Q11.1 R95.1 R97.1
NetQ12_1: Q12.1 R100.1 R102.1
NetQ13_1: Q13.1 R101.1 R103.1
NetQ14_1: Q14.1 R106.1 R108.1
NetQ15_1: Q15.1 R107.1 R109.1
NetQ16_1: Q16.1 R112.1 R114.1
NetQ17_1: Q17.1 R113.1 R115.1
NetR3_1: R3.1 R4.2 tp1.1
NetR15_1: R15.1 R16.2 tp2.1
VOCT_A: IC4.1 IC5.5 tp5.1
VOCT_B: IC4.2 IC5.10 tp6.1
VOUT_REF: R23.1 R25.2 SW3.2
VOUTA: IC7.2 IC8.3
VOUTA2: IC9.3 IC11.2
VOUTB: IC7.3 IC8.5
VOUTB2: IC9.5 IC11.3
VOUTC: IC7.4 IC8.10
VOUTC2: IC9.10 IC11.4
VOUTD: IC7.5 IC8.12
VOUTD2: IC9.12 IC11.5
VREF: C82.1 IC4.10 IC5.3 tp8.1
VREF_5: C39.2 C43.2 IC7.7 IC11.7 IC14.1 R60.1 R62.1 R72.1 R74.1 R116.2
VREF_ADC: C67.2 C68.2 IC15.1
VREF_BUF: IC5.1 R24.1 SW3.1 tp7.1
pads on no net: IC2.16 IC2.26 IC2.36 IC2.37 IC2.41_10 IC2.41_11 IC2.41_12 IC2.41_13 IC2.41_14 IC2.41_15 IC2.41_16 IC2.41_17 IC2.41_18 IC2.41_19 IC2.41_20 IC2.41_21 IC6.7 IC10.3 IC12.14 IC13.7 IC14.3 IC17.7 J1.A8 J1.B8 J2.2 J3.2 J4.2 J5.2 J6.2 J7.2 J8.2 J9.2 J10.2 J11.2 J12.2 J13.2 J14.2 J15.2 J16.2 J17.2 J18.MH J20.2 J21.5 J21.6 J22.2 J23.2 J26.2 J28.2 Q9.1 Q9.4 SW1.1 SW1.B1 SW1.B2 SW2.1 SW2.B1 SW2.B2 U1.4

## Polygon pours and split planes (outlines as drawn)
GND on PWR (split plane): 98.49,0.51 0.51,0.51 0.51,107.49 98.49,107.49
+3.3 on GND (split plane): 98.49,0.51 0.51,0.51 0.51,107.49 98.49,107.49

## Silkscreen, mask and mechanical layers (free items; w line width, h text height)
Mechanical 1:
  the board outline again, w0.5

## Text inside footprints (layer, text, board x,y; h text height)
C83: Bottom Overlay "+" at 94.125,105.9 h1.22 r270
C85: Bottom Overlay "+" at 65.8,105.6 h1.22 r270
IC2: Mechanical 13 "ANTENNA" at 28.5,104.062 h1.27